# Altium PCB PCB1.PcbDoc
Units mil, origin at the board's own origin, x right, y up, seen from the top; angles counter-clockwise.
Board outline 6000 x 4000 mil, 2 copper layers (Top Layer, Bottom Layer); 33 components, 51 nets, 167 pads, 0 vias.
Unrouted connection lines stored in the file: 108.
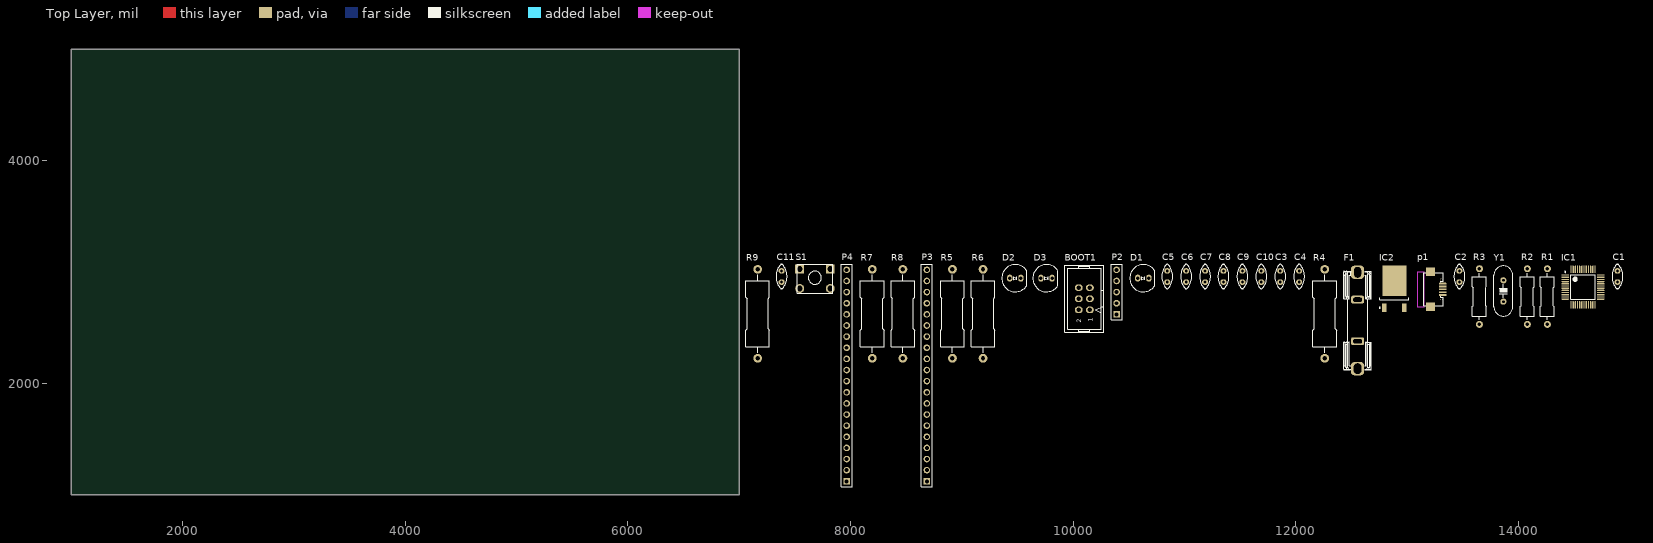
[diagram p0: Top Layer view]
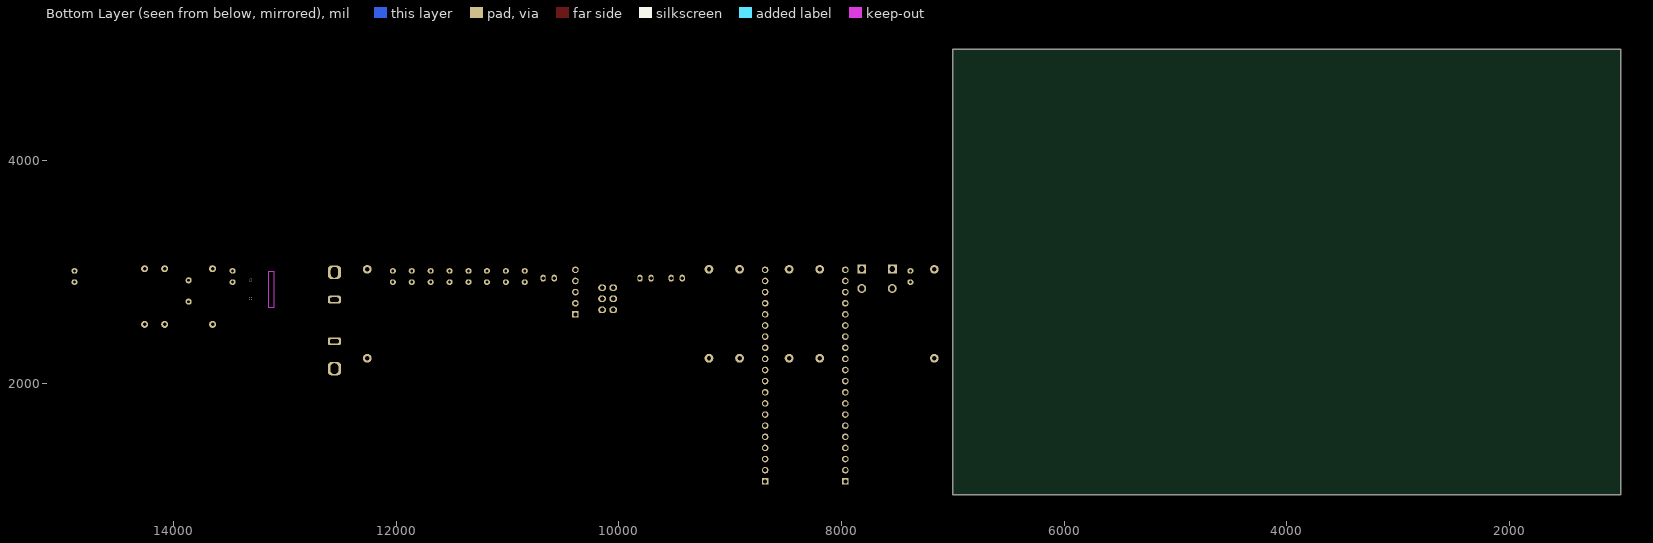
[diagram p1: Bottom Layer view, seen from below]

## Layer stack, top to bottom
Top Solder: solder mask 0.4, Solder Resist, Dk 3.5
Top Layer: signal copper 1.4
Dielectric 1: dielectric 12.6, FR-4, Dk 4.8
Bottom Layer: signal copper 1.4
Bottom Solder: solder mask 0.4, Solder Resist, Dk 3.5

## Board outline
1000,1000 7000,1000 7000,5000 1000,5000

## Design rules (kind name [scope] priority, off if disabled: settings)
Clearance [All] p1: gap=10 ignorepadtopadclearanceinfootprint=FALSE
PolygonConnect [All] p1: connectstyle=Relief reliefconductorwidth=10 reliefentries=4 polygonreliefangle="90 Angle" airgapwidth=10
RoutingVias [All] p1: holewidth=28 width=50 viastyle="Through Hole" minholewidth=28 minwidth=50 maxholewidth=28 maxwidth=50
SolderMaskExpansion [All] p1: expansion=4 istentingtop=FALSE
SupplyNets "Schematic Supply Nets_1" [InNet('+3.3')] p1: voltage=0.000
SupplyNets "Schematic Supply Nets" [InNet('+5')] p2: voltage=0.000
Width [All] p1: maxlimit=10 minlimit=10 preferedwidth=10
30 further rules are at their usual default settings.

## Classes and differential pairs
component class Sheet1: BOOT1 C1 C2 C3 C4 C5 C6 C7 C8 C9 C10 C11 D2 D3 F1 IC1 IC2 p1 P2 P3 P4 R1 R2 R4 R5 R6 R7 R8 R9 S1 Y1

## Components (designator, comment, footprint, x,y, rotation, side; value= is the part's Value field where it differs from the comment)
BOOT1 "Header 3X2" IDC_2X3 10100,2760 r90 top
C1 "20F" "Cap - 100nF" 14890,2960 r90 top
C2 "20F" "Cap - 100nF" 13470,2960 r90 top
C3 "1UF" "Cap - 100nF" 11860,2960 r90 top
C4 "100nF" "Cap - 100nF" 12030,2960 r90 top
C5 "100nF" "Cap - 100nF" 10845,2960 r90 top
C6 "100nF" "Cap - 100nF" 11015,2960 r90 top
C7 "100nF" "Cap - 100nF" 11185,2960 r90 top
C8 "100nF" "Cap - 100nF" 11350,2960 r90 top
C9 "100nF" "Cap - 100nF" 11520,2960 r90 top
C10 "100nF" "Cap - 100nF" 11690,2960 r90 top
C11 "1UF" "Cap - 100nF" 7380,2960 r90 top
D1 "LED 5MM" LED5MM_GRN 10630,2945 r0 top
D2 "LED5MM" LED5MM_BLUE 9480,2945 r0 top
D3 "LED5MM" LED5MM_BLUE 9760,2945 r0 top
F1 "F=1.0 A" "Fuse 5x20 With holder pin" 12555,2565 r0 top
IC1 "IC_MCU_STM32F103C8T6" LQFP48_N 14580,2865 r0 top
IC2 "LM1117DT-x.x" TD03B_N 12885,2850 r90 top
p1 "USB Connector" USB_AB_BM_SHS 13265,2845 r90 top
P2 "Program interface SWD" HDR1X5 10390,2620 r90 top
P3 "Header 20" HDR1X20 8685,1120 r90 top
P4 "Header 20" HDR1X20 7965,1120 r90 top
R1 "2.2K" "Axial 0_5W 5_0mm" 14260,2780 r90 top
R2 "20R" "Axial 0_5W 5_0mm" 14080,2780 r90 top
R3 "20R" "Axial 0_5W 5_0mm" 13650,2780 r90 top
R4 "10K" "Axial 2W 8_0mm" 12260,2625 r90 top
R5 "100K" "Axial 2W 8_0mm" 8915,2625 r90 top
R6 "100K" "Axial 2W 8_0mm" 9190,2625 r90 top
R7 "10K" "Axial 2W 8_0mm" 8195,2625 r90 top
R8 "10K" "Axial 2W 8_0mm" 8470,2625 r90 top
R9 "10K" "Axial 2W 8_0mm" 7165,2625 r90 top
S1 "Switch PB" "Switch - Push to On" 7680,2940 r0 top
Y1 "8MHZ" "CRYSTAL Small" 13865,2830 r90 top value="12 MHz"

## Footprints (in the part's own frame and the unit in brackets; to place one, negate y for a bottom-side part, rotate by r counter-clockwise, add the part's x,y. Pads: shape width x height; smd on the part's side, far side on the other; paste and mask are expansions set on the pad)
"Axial 0_5W 5_0mm" [mm] "Designer Abbas Basereh"
  round 1.6 hole 0.8: 1(6.35,0) 2(-6.35,0)
  silkscreen extent -5.3,-1.6 5.3,1.6, body extent -6.7,-1.65 6.7,1.65, height 4.02
"Axial 2W 8_0mm" [mm] "Designer Abbas Basereh"
  round 2 hole 1: 1(10.15,0) 2(-10.15,0)
  silkscreen extent -8.9,-2.7 8.9,2.7, body extent -10.56,-2.75 10.57,2.75, height 5.97
"Cap - 100nF" [mil]
  oval 50x55 hole 25: 1(-50,0) 2(50,0)
  silkscreen extent -110,-49 110,49, body extent -115,-34 115,33, height 272
"CRYSTAL Small" [mil] "DESIGNER ABBAS BASEREH"
  round 55 hole 25: 1(-96.06,0) 2(96.06,0)
  silkscreen extent -225,-85 225,85, body extent -226,-89 226,89, height 142
"Fuse 5x20 With holder pin" [mm] "Dsigner : Abbas Basereh"
  rrect50% 3x1.8 hole 1 slot 2 at 0 deg: 1(0,4.75) 2(0,-4.75)
  rrect50% 3x3 hole 1.6 slot 2.4 at 90 deg: 1(0,11)
  rrect50% 3x3 hole 1.7 slot 2.4 at 90 deg: 2(0,-11)
  silkscreen extent -3.18,-11.19 3.17,11.19, body extent -3.17,-11.69 3.17,11.69, height 8.63
HDR1X5 [mm] "Connector; Header; 5 Position"
  rect 1.5x1.5 hole 0.9: 1(0,0)
  round 1.5 hole 0.9: 2(2.54,0) 3(5.08,0) 4(7.62,0) 5(10.16,0)
  silkscreen extent -1.27,-1.27 11.43,1.27, body extent -1.28,-1.27 11.42,1.27, height 8.38
HDR1X20 [mm] "Connector; Header; 20 Position"
  rect 1.5x1.5 hole 0.9: 1(0,0)
  round 1.5 hole 0.9: 2(2.54,0) 3(5.08,0) 4(7.62,0) 5(10.16,0) 6(12.7,0) 7(15.24,0) 8(17.78,0) 9(20.32,0) 10(22.86,0) 11(25.4,0) 12(27.94,0) 13(30.48,0) 14(33.02,0) 15(35.56,0) 16(38.1,0) 17(40.64,0) 18(43.18,0) 19(45.72,0) 20(48.26,0)
  silkscreen extent -1.27,-1.27 49.53,1.27
IDC_2X3 [mm] "IDC2X3 FOR PROGPIN AND JUMPER BOX AND ETC. DESIGNER ABBAS BASEREH"
  oval 1.5x1.8 hole 1 mask+0.1: 1(-2.54,-1.27) 2(-2.54,1.27) 3(0,-1.27) 4(0,1.27) 5(2.54,-1.27) 6(2.54,1.27)
  silkscreen extent -7.62,-4.45 7.62,4.45, body extent -7.61,-4.25 7.61,4.6, height 9.17
LED5MM_BLUE [mm] "LED 5MM THROUGH HOLE BLUE-Designer Abbas Basereh"
  oval 1.2x1.6 hole 0.8: 1(-1.27,0) 2(1.27,0)
  silkscreen extent -3.1,-3.1 2.6,3.1, body extent -3,-3 2.5,3, height 9.14
LED5MM_GRN [mm] "LED 5MM THROUGH HOLE GREEN-Designer Abbas Basereh"
  oval 1.2x1.6 hole 0.8: 1(-1.27,0) 2(1.27,0)
  silkscreen extent -3.1,-3.1 2.6,3.1, body extent -3,-3 2.5,3, height 9.14
LQFP48_N [mm] "LQFP, 48-Leads, Body 9.1x9.1mm (max), Pitch 0.50mm, IPC Medium Density"
  oval 1.7x0.3 smd: 1(-4.05,2.75) 2(-4.05,2.25) 3(-4.05,1.75) 4(-4.05,1.25) 5(-4.05,0.75) 6(-4.05,0.25) 7(-4.05,-0.25) 8(-4.05,-0.75) 9(-4.05,-1.25) 10(-4.05,-1.75) 11(-4.05,-2.25) 12(-4.05,-2.75) 25(4.05,-2.75) 26(4.05,-2.25) 27(4.05,-1.75) 28(4.05,-1.25) 29(4.05,-0.75) 30(4.05,-0.25) 31(4.05,0.25) 32(4.05,0.75) 33(4.05,1.25) 34(4.05,1.75) 35(4.05,2.25) 36(4.05,2.75)
  oval 0.3x1.7 smd: 13(-2.75,-4.05) 14(-2.25,-4.05) 15(-1.75,-4.05) 16(-1.25,-4.05) 17(-0.75,-4.05) 18(-0.25,-4.05) 19(0.25,-4.05) 20(0.75,-4.05) 21(1.25,-4.05) 22(1.75,-4.05) 23(2.25,-4.05) 24(2.75,-4.05) 37(2.75,4.05) 38(2.25,4.05) 39(1.75,4.05) 40(1.25,4.05) 41(0.75,4.05) 42(0.25,4.05) 43(-0.25,4.05) 44(-0.75,4.05) 45(-1.25,4.05) 46(-1.75,4.05) 47(-2.25,4.05) 48(-2.75,4.05)
  silkscreen extent -4.17,-2.8 2.8,3.57, body extent -4.5,-4.51 4.5,4.49, height 1.56
"Switch - Push to On" [mil]
  rect 80x80 hole 50: 1(-137.5,87.5) 1(137.5,87.5)
  round 80 hole 50: 2(-137.5,-87.5) 2(137.5,-87.5)
  silkscreen extent -160,-130 160,130, body extent -155,-121 157,123, height 205
TD03B_N [mm] "D-PAK, 4-Leads, Body 6.1x6.6mm, Pitch 2.29mm, Lead Span 9.7mm, IPC Medium Density"
  rect 1.9x0.95 smd: 1(-4.35,2.28) 3(-4.35,-2.28)
  rect 6.9x5.5 smd: 4(1.85,0)
  silkscreen extent -4.47,-3.35 -2,3.43, body extent -5.18,-3.27 4.76,3.27, height 2.34
USB_AB_BM_SHS [mm] "USB Micro AB - Standard (Bottom mount), Shell SMT DESIGNER ABBAS BASEREH"
  oval 0.4x1.8 smd: 1(1.3,-1.4) 2(0.65,-1.4) 3(0,-1.4) 4(-0.65,-1.4) 5(-1.3,-1.4)
  rect 2x2 smd: 5(-4,1.4) 5(4,1.4)
  round 0.7 hole 0.7: H(-2.1,-1.1) H(2.1,-1.1)
  Keep-Out Layer board cut-out: -4.064,2.9 -4.064,4.291 4.064,4.291 4.064,2.9
  silkscreen extent -3.8,-1.47 3.8,2.9, body extent -4,-1.78 4,4.26, height 2.75

## Part data
BOOT1: "Header, 3-Pin, Dual row", LatestRevisionDate=17-Jul-2002, LatestRevisionNote="Re-released for DXP Platform.", Publisher="Altium Limited"
C1 C2 C3 C4 C5 C6 C7 C8 C9 C10 C11: library part Cap-Bipolar, "Bipolar Capacitor", Voltage=100V, Adding Date=1387/12/20, Designer="Saeid Jorablo", Organazation=ControTec
D1: "Light Emitting Diode", Data=16-12-2016, Designer="Abbas Basereh"
D2 D3: "LED LIGHTING", Data=16-12-2016, Designer="Abbas Basereh"
F1: library part "Fuse 5x20 with holdeer pins", "Fuses 5x20", Data=28-12-2016, Desc.="fuse with holder pins 5x20", Designer="Abbas Basereh"
IC1: "STM32 ARM-based 32-bit MCU with 64 Kbytes Flash, 48-pin LQFP, Industrial Temperature", Manufacturer="ST Microelectronics", Supplier Part Number 1=497-11517-ND, Voltage="2.0-3.6 (v)", Company="SJ Libraries", ComponentLink1Description=Datasheet, ComponentLink1URL=http://www.st.com/stonline/products/literature/ds/13587.pdf, ComponentLink2Description=Reference, ComponentLink2URL=www.st.com/stm32, DatasheetVersion="rev6, Mar-2008", Designer="Eng. Saeid Jorablo", HelpURL=http://s3.picofile.com/file/7443264187/Coming_Soon_logo.gif, Mounting Technology="Surface Mount", PackageDescription="48-Pin Low-Profile Quad Flat Pack, 7 x 7 mm Body, 0.5 mm Pitch (LQFP48)", PackageReference=LQFP48, PinCount=48, Published=30-May-2008, Publisher="Saeid UnLimited", Revision 1="7/16/2012: Add Model", Supplier 1=Digi-Key, Supplier 2=Farnell, Supplier 3=Farnell, Supplier 4=Digi-Key, Supplier Part Number 2=1899017, Supplier Part Number 3=1447637, Supplier Part Number 4=497-6063-ND, TYPE=IC
IC2: "x.x Volt, 800mA Low-Dropout Linear Regulator, 3-pin TO-252", Manufacturer="National Semiconductor", PackageTopMarking=NSUZXYTT*LM1117*DT-X.X, PartNumber=LM1117DT-3.3, PowerWise=N, Code_JEDEC=TO-252-AA, ComponentLink1Description="LM1117 Datasheet", ComponentLink1URL=http://www.national.com/ds/LM/LM1117.pdf, ComponentLink2Description="LM1117 Web Page", ComponentLink2URL=http://www.national.com/pf/LM/LM1117.html, ComponentLink3Description="TD03B Package Page", ComponentLink3URL=http://www.national.com/packaging/folders/td03b.html, CompType="LDO IC", DatasheetVersion=Apr-2006, PackageDescription="TO252, Molded, Jedec, 6.8 x 6.10 x 2.30mm Body, 3 Lead, 2.28mm Pitch, Surface Mount", PackageReference=TD03B, PackageVersion="revD, Feb-2009", PinCount=3, RoHS=N, Supplier 1=Farnell, Supplier 2=Farnell
p1: library part "USB MICRO", "USB Connector MICRO-B Type", Max Current=1600mA, Category=Connector, ComponentLink1Description=Datasheet, ComponentLink2Description=Reference, Designer="ABBAS BASEREH", Mounting Technology="Surface Mount\Through-Hole", Pin Count=5-7, Publisher="ABBAS BASEREH", Status=Unreleased, Update=1395-11-17
P2: library part "Header 5", "Header, 5-Pin", LatestRevisionDate=17-Jul-2002, LatestRevisionNote="Re-released for DXP Platform.", Publisher="Altium Limited"
P3 P4: "Header, 20-Pin", LatestRevisionDate=17-Jul-2002, LatestRevisionNote="Re-released for DXP Platform.", Publisher="Altium Limited"
R1 R2 R3: library part "RES Axial 0.5W", "RES Axial 0.5W", Data=4-1-2017, Desc.="RES Axial 0.5W", Designer="Abbas Basereh"
R4 R5 R6 R7 R8 R9: library part "RES Axial 2W", "RES Axial 2W", Data=4-1-2017, Desc.="RES Axial 2W", Designer="Abbas Basereh"
S1: "Push Button Switch"
Y1: library part XTAL_Crystal, "XTAL Crystal", ComponentLink1Description=Datasheet, ComponentLink2Description=Reference, Design Date=2017-1-3, Designer="ABBAS BASEREH", Mounting Technology="Surface Mount\Through-Hole", Status=Unreleased

## Nets (pads, with @x,y where several pads share a name; then routed paths per layer and width w, separated by ;. In a path a pad name is that pad's centre, name@x,y a point inside that pad or via, vN(x,y) a via of type N, cw(c..) or ccw(c..) an arc to the next point about the centre after c; other vN are vias at no path point)
+3.3: BOOT1.1 BOOT1.2 C5.1 C6.1 C7.1 C8.1 C9.1 C10.1 IC1.9 IC1.24 IC1.48 IC2.4 P3.18 P4.20 R4.2 R7.2 R8.2 R9.2
+5: BOOT1.5 BOOT1.6 C1.1 C2.1 C3.2 C4.2 C5.2 C6.2 C7.2 C8.2 C9.2 C10.2 C11.2 D1.2 D3.2 F1.1 IC1.8 IC1.23 IC1.35 IC1.47 IC2.1 p1.1 p1.4 p1.5 P3.19 P3.20 P4.18 P4.19 R1.2 S1.1
BOOT0: IC1.44 R6.1
BOOT1: IC1.20 R5.2
NetBOOT1_3: BOOT1.3 R5.1
NetBOOT1_4: BOOT1.4 R6.2
NetC3_1: C3.1 C4.1 F1.2 IC2.3
NetD2_1: D2.1 R7.1
NetD3_1: D3.1 R8.1
Netp1_2: p1.2 R2.1
Netp1_3: p1.3 R3.1
OSCIN: C1.2 IC1.5 Y1.1
OSCOUT: C2.2 IC1.6 Y1.2
PA0: IC1.10 P3.5
PA1: IC1.11 P3.6
PA2: IC1.12 P3.7
PA3: IC1.13 P3.8
PA4: IC1.14 P3.9
PA5: IC1.15 P3.10
PA6: IC1.16 P3.11
PA7: IC1.17 P3.12
PA8: IC1.29 P4.5
PA9: IC1.30 P4.6
PA10: IC1.31 P4.7
PA11: IC1.32 P4.8 R2.2
PA12: IC1.33 P4.9 R1.1 R3.2
PA13: IC1.34
PA14: IC1.37
PA15: IC1.38 P4.10
PB0: IC1.18 P3.13
PB1: IC1.19 P3.14
PB3: IC1.39 P4.11
PB4: IC1.40 P4.12
PB5: IC1.41 P4.13
PB6: IC1.42 P4.14
PB7: IC1.43 P4.15
PB8: IC1.45 P4.16
PB9: IC1.46 P4.17
PB10: IC1.21 P3.15
PB11: IC1.22 P3.16
PB12: IC1.25 P4.1
PB13: IC1.26 P4.2
PB14: IC1.27 P4.3
PB15: IC1.28 P4.4
PC13: D2.2 IC1.2 P3.2
PC14: IC1.3 P3.3
PC15: IC1.4 P3.4
RESET: C11.1 IC1.7 P3.17 R9.1 S1.2
SWCLK: 
SWDIO: 
VBAT: IC1.1 P3.1
pads on no net: D1.1 IC1.36 p1.H P2.1 P2.2 P2.3 P2.4 P2.5 R4.1

## Text inside footprints (layer, text, board x,y; h text height)
BOOT1: Top Overlay "2" at 10071,2543 h39.37 r90; Top Overlay "1" at 10176,2554 h39.37 r90
p1: Mechanical 1 "PCB EDGE" at 13141.06,2750 h27.56 r90